# Altium PCB Stepper Board-v1.0.PcbDoc (part 7 of 8)
Units mil, origin at the board's own origin, x right, y up, seen from the top; angles counter-clockwise.
Board outline 6225.19 x 6531 mil, 4 copper layers (Top Layer, Layer-1, Layer-2, Bottom Layer), stack 61.654 mil thick; 410 components, 372 nets, 1464 pads, 1083 vias.
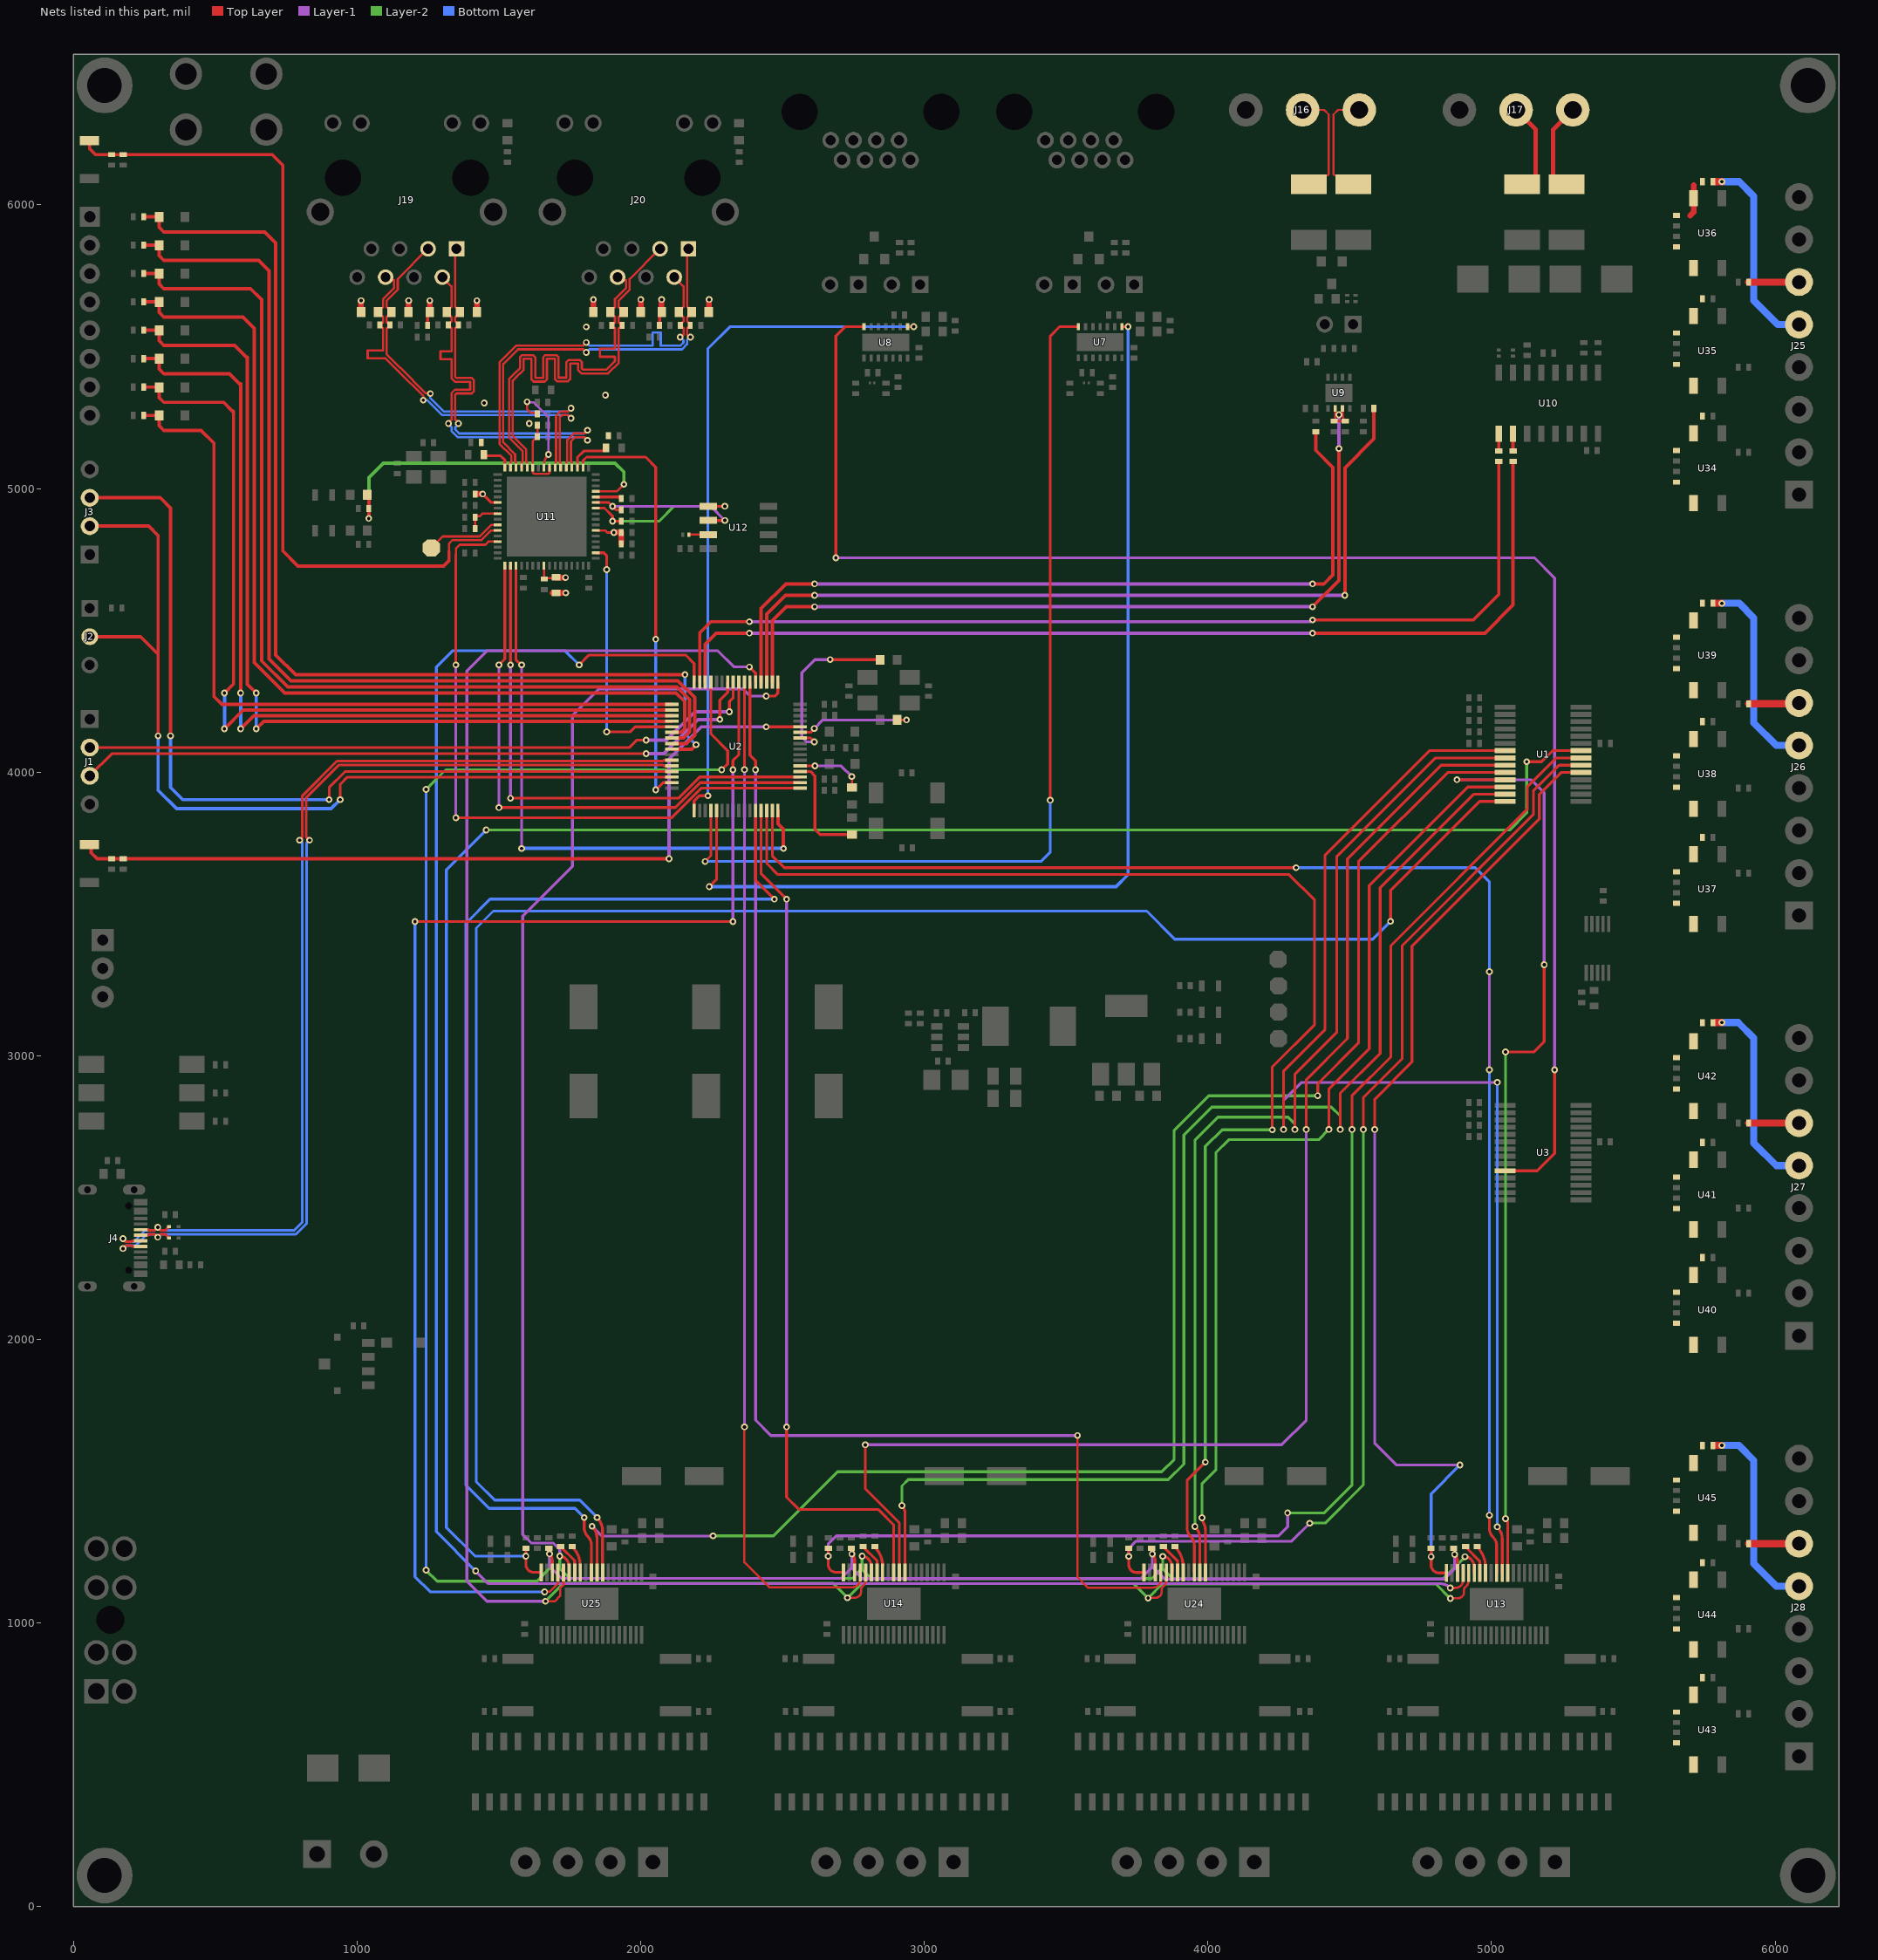
[diagram p6: the nets of this part, all layers, seen from the top]

## Via types
v1: diameter 23.62, hole 11.81, Top Layer to Bottom Layer, 1081 vias
v2: diameter 23.62, hole 11.81, Top Layer to Bottom Layer, tented both sides, 2 vias

## Nets (pads, with @x,y where several pads share a name; then routed paths per layer and width w, separated by ;. In a path a pad name is that pad's centre, name@x,y a point inside that pad or via, vN(x,y) a via of type N, cw(c..) or ccw(c..) an arc to the next point about the centre after c; other vN are vias at no path point) (continued)
NetR69_1: R69.1 U10.10 | length 60.8
  Top Layer w12: R69.1@5075.76,5132.86 U10.10@5075.76,5193.69
NetR70_1: R70.1 U10.9 | length 60.8
  Top Layer w12: R70.1@5025.76,5132.86 U10.9@5025.76,5193.69
NetR73_2: R73.2 R74.2 U11.8 | length 123.4
  Top Layer w8: R73.2@1416.05,4860.05 R74.2@1416.05,4899.12 1419.29,4902.37 1432.37,4902.37 1441.36,4911.36 U11.8@1495.32,4911.36
NetR75_2: R75.2 U11.57 | length 358.3
  Top Layer w8: v1(1599.01,5306) 1599.01,5279.99 1611.75,5267.25 R75.2@1638.16,5267.25 ; R75.2@1635.5,5263 1635.5,5267.25 R75.2@1635.5,5271.5 ; U11.57@1658.71,5074.75 1658.71,5082.23 cw(c1712.62,5082.23) v1(1674.5,5120.35)
  Layer-1 w8: v1(1599.01,5306) 1601.34,5303.68 1622.82,5303.68 1674.5,5252 v1(1674.5,5120.35)
NetR76_2: R76.2 U11.44 | length 89.7
  Top Layer w10: U11.44@1841.78,4970.42 R76.2@1931.5,4970.42
NetR82_1: R82.1 U12.7 | length 68.9
  Top Layer w8: R82.1@2169.38,4837.52 U12.7@2238.25,4837.52
NetR103_2: R103.2 U13.12 | length 76.7
  Top Layer w10: R103.2@4950.13,1267.02 cw(c4881.04,1197.94) U13.12@4978.75,1197.94
NetR104_2: R104.2 U13.13 | length 109.5
  Top Layer w10: R104.2@4909.6,1267.02 4958.54,1218.08 ; U13.13@4959.06,1176.5 4959.06,1216.83
NetR105_2: R105.2 U14.12 | length 76.7
  Top Layer w10: R105.2@2824.13,1269 cw(c2755.04,1199.91) U14.12@2852.75,1199.91
NetR106_2: R106.2 U14.13 | length 109.5
  Top Layer w10: R106.2@2783.6,1269 2832.54,1220.06 ; U14.13@2833.06,1178.47 2833.06,1218.81
NetR118_2: R118.2 U24.12 | length 76.7
  Top Layer w10: R118.2@3884.13,1268.35 cw(c3815.04,1199.26) U24.12@3912.75,1199.26
NetR119_2: R119.2 U24.13 | length 109.5
  Top Layer w10: R119.2@3843.6,1268.35 3892.54,1219.41 ; U24.13@3893.06,1177.82 3893.06,1218.16
NetR120_2: R120.2 U25.12 | length 98.2
  Top Layer w10: R120.2@1758.13,1269 cw(c1689.04,1199.91) 1786.75,1199.91 U25.12@1786.75,1178.47
NetR121_2: R121.2 U25.13 | length 110.9
  Top Layer w10: R121.2@1717.6,1269 1766.54,1220.06 cw(c1765.29,1218.81) 1767.06,1218.81 U25.13@1767.06,1178.47
NetR126_2: R126.2 U34.1
NetR127_2: R127.2 U35.1
NetR128_2: R128.2 U36.1
NetR129_2: R129.2 U37.1
NetR130_2: R130.2 U38.1
NetR131_2: R131.2 U39.1
NetR132_1: R132.1 R138.1 U34.4
NetR133_1: R133.1 R139.1 U35.4
NetR134_1: R134.1 R140.1 U36.4 | length 111.9
  Top Layer w20: 5700.67,5962.79 5712.39,5974.51 U36.4@5712.39,6023.32 5712.39,6069.79
NetR135_1: R135.1 R141.1 U37.4
NetR136_1: R136.1 R142.1 U38.4
NetR137_1: R137.1 R143.1 U39.4
NetR144_2: R144.2 U40.1
NetR145_2: R145.2 U41.1
NetR146_2: R146.2 U42.1
NetR147_2: R147.2 U43.1
NetR148_2: R148.2 U44.1
NetR149_2: R149.2 U45.1
NetR150_1: R150.1 R156.1 U40.4
NetR151_1: R151.1 R157.1 U41.4
NetR152_1: R152.1 R158.1 U42.4
NetR153_1: R153.1 R159.1 U43.4
NetR154_1: R154.1 R160.1 U44.4
NetR155_1: R155.1 R161.1 U45.4
NetTP5_1: TP5.1 U11.10 | length 267.3
  Top Layer w8: TP5.1@1261.57,4791 1301.72,4831.15 1432.43,4831.15 1473.27,4871.99 U11.10@1495.32,4871.99
nFAULT_CAN: U2.53 U7.8 | length 3727.9
  Top Layer w8: U7.8@3696.77,5570.81 v1(3718.5,5570.81)
  Top Layer w10: v1(2241.52,3596) 2267.1,3621.59 U2.53@2267.1,3864.63
  Bottom Layer w12: v1(2241.52,3596) 3676,3596 3718.5,3638.5 v1(3718.5,5570.81)
nFAULT_CAN_2: U2.49 U8.8 | length 2452.8
  Top Layer w8: U8.8@2940.69,5570.61 v1(2962.42,5570.61)
  Top Layer w10: U2.49@2188.36,3864.63 2188.36,3898.15 2207.21,3917 v1@2244,3917
  Bottom Layer w10: v1(2237,3917) 2237,5444.61 2237,5494 2313.61,5570.61 v1(2962.42,5570.61)
NRST: C11.2 R33.1 SW1.2 U2.12 | length 2936.4
  Top Layer w12: SW1.2@62.49,3743.95 62.49,3715.37 83.36,3694.5 C11.2@134,3694.5 R33.1@175,3694.5 2098.5,3694.5 v1@2100,3696 ; v1(2442.18,4159.9) U2.12@2562.37,4159.9
  Layer-1 w12: v1(2100,3694.5) 2100,4046 2213.9,4159.9 v1(2442.18,4159.9)
nSLEEP-1: U1.25 U13.8 | length 3365.1
  Top Layer w10: v1(4878,3973.29) U1.25@5047.97,3973.29 ; v1(5049.26,1367.86) cw(c5029.41,1348) 5057.49,1348 U13.8@5057.49,1176.5 ; v1(5049.26,3013.02) 5149.33,3013.02 5185.96,3049.64 v1(5185.96,3320.62)
  Layer-1 w10: v1(4878,3973.29) 5139.71,3973.29 5186,3927 5186,3320.66 v1(5185.96,3320.62)
  Layer-2 w10: v1(5049.26,1367.86) v1(5049.26,3013.02)
nSLEEP-2: U1.26 U24.8 | length 3480.7
  Top Layer w10: v1(3978.93,1370.86) 3978.44,1370.86 3975.15,1367.56 cw(c3925.2,1323.99) 3991.49,1323.97 ; U24.8@3991.49,1177.82 3991.49,1323.92 ; v1(4426.39,2740) 4426.39,2882.39 4569,3025 4569,3599.87 4916.84,3947.7 U1.26@5047.97,3947.7
  Layer-2 w10: v1(3978.93,1370.86) 3978.93,1490 4028,1539.07 4028,2658 4074,2704 4390.39,2704 v1(4426.39,2740)
nSLEEP-3: U1.27 U14.8 | length 4634.2
  Top Layer w10: v1(2921,1414) cw(c2895.69,1388.69) 2931.49,1388.69 U14.8@2931.49,1178.47 ; v1(4466.55,2740) 4466.55,2867.55 4607,3008 4607,3592.04 4937.07,3922.11 U1.27@5047.97,3922.11
  Layer-2 w10: v1(2921,1414) 2921,1483 2943,1505 3860,1505 3915,1560 3915,2720 4014,2819 4435,2819 4466.55,2787.45 v1(4466.55,2740)
nSLEEP-4: U1.28 U25.8 | length 6588.1
  Top Layer w10: v1(1846.07,1371.51) cw(c1799.2,1324.64) 1865.49,1324.62 ; U25.8@1865.49,1178.47 1865.49,1324.57 ; v1(4644,3474) 4644,3583 4957.52,3896.52 U1.28@5047.97,3896.52
  Bottom Layer w10: v1(1846.07,1371.51) 1784.58,1433 1485,1433 1420,1498 1420,3450 1480,3510 3784,3510 3883,3411 4581,3411 4643,3473 v1@4645,3473
nSTB_CAN: U2.52 U7.14 | length 3351.6
  Top Layer w10: v1(2227,3685) 2247.42,3705.42 U2.52@2247.42,3864.63 ; v1(3444,3901) 3444,5538 3476.81,5570.81 U7.14@3543.23,5570.81
  Bottom Layer w10: v1(2227,3685) 3411,3685 3444,3718 v1(3444,3901)
nSTB_CAN_2: U3.24 U8.14 | length 5687.9
  Top Layer w10: v1(2687.92,4756) 2687.92,5537.8 2720.73,5570.61 U8.14@2787.14,5570.61 ; U3.24@5047.97,2594.32 5161.55,2594.32 5222.58,2655.34 v1(5222.58,2950)
  Layer-1 w10: v1(2687.92,4756) 3542,4756 5151,4756 5222.58,4684.42 v1(5222.58,2950)
PA8: D6.1 R27.1 U2.36 | length 3223
  Top Layer w12: R27.1@247.5,5558 D6.1@301.71,5558 301.71,5521.29 318,5505 567.72,5505 609,5463.72 ; 613,5463.72 613,4310 v1(644,4279) ; v1(644,4153) 670.58,4179.58 U2.36@2109.63,4179.58
  Bottom Layer w12: v1@639,4153 v1@639.5,4153.5 ; v1(644,4153) v1(644,4279)
PB13: D3.1 R30.1 U2.33 | length 2829
  Top Layer w12: R30.1@247.5,5258 D3.1@301.72,5258 301.72,5221.29 318.01,5205 450,5205 495,5160 495,4267 523.36,4238.64 U2.33@2109.63,4238.64
PB14: D4.1 R29.1 U2.34 | length 3107
  Top Layer w12: R29.1@247.5,5358 D4.1@301.71,5358 ; D4.1@301.71,5357 301.71,5320.29 317.99,5304 529,5304 560,5273 ; v1(532,4153) 597.95,4218.95 U2.34@2109.63,4218.95 ; v1(532,4279) 564,4311 564,5273
  Bottom Layer w12: v1(532,4153) v1(532,4279)
PB15: D5.1 R28.1 U2.35 | length 3151.7
  Top Layer w12: R28.1@247.5,5458 D5.1@301.71,5458 301.71,5421.29 318,5405 549,5405 585,5369 ; v1(589,4153) 635.27,4199.27 U2.35@2109.63,4199.27 ; v1(589,4279) 589,5369
  Bottom Layer w12: v1(589,4153) v1(589,4279)
PC6: D7.1 R26.1 U2.38 | length 3349.3
  Top Layer w12: R26.1@247.5,5658 D7.1@301.71,5658 301.71,5621.29 318,5605 597,5605 637,5565 637,4387 745,4279 2124.96,4279 2155,4248.96 2155,4153 2142.31,4140.31 2109.72,4140.31 U2.38@2109.63,4140.21
PC7: D8.1 R25.1 U2.39 | length 3499.7
  Top Layer w12: R25.1@247.5,5758 D8.1@301.71,5758 301.71,5721.29 318,5705 624,5705 663,5666 663,4392 755,4300 2128,4300 2172,4256 2172,4142 2150.53,4120.53 U2.39@2109.63,4120.53
PC14-OSC32_IN: R2.2 U2.4 | length 384.2
  Top Layer w10: U2.4@2562.37,4002.42 2598.22,4002.42 2614,3986.64 2614,3798.7 2632.7,3780 R2.2@2744.37,3780
PC15-OSC32_OUT: R3.2 U2.5 | length 235.9
  Top Layer w8: R3.2@2744.37,3946 v1(2744.37,3984.37)
  Top Layer w10: U2.5@2562.47,4022 v1(2614,4022)
  Layer-1 w10: v1(2614,4022) 2706.74,4022 v1(2744.37,3984.37)
PD8: D9.1 R24.1 U2.40 | length 3652.1
  Top Layer w12: R24.1@247.5,5858 D9.1@301.71,5858 301.71,5821.29 318,5805 652,5805 689,5768 689,4399 766,4322 2131,4322 2190,4263 2190,4130 2160.84,4100.84 U2.40@2109.63,4100.84
PD9: D11.1 R23.1 U2.41 | length 3805.7
  Top Layer w12: R23.1@247.5,5958 D11.1@301.71,5958 301.71,5921.29 318,5905 674,5905 713,5866 713,4413 783,4343 v1@2156.51,4343 ; U2.41@2109.63,4081.16 2179.16,4081.16 v1(2195,4097)
  Bottom Layer w10: v1(2156,4344) 2156,4136 v1(2195,4097)
PF0-OSC_IN: R4.2 U2.10 | length 629.1
  Top Layer w10: U2.10@2562.37,4120.53 2598.22,4120.53 v1(2612,4106.75) ; v1(2668,4397) 2843.12,4397 R4.2@2844.12,4396
  Layer-1 w10: v1(2612,4106.75) 2585.26,4106.75 2568,4124 2568,4351 2614,4397 v1(2668,4397)
PF1-OSC_OUT: R5.2 U2.11 | length 425.6
  Top Layer w10: U2.11@2562.37,4140.21 2598.22,4140.21 v1(2612,4154) ; R5.2@2904.13,4183.96 v1(2937,4183.96)
  Layer-1 w10: v1(2612,4154) 2641.97,4183.96 v1(2937,4183.96)
PUL+_1: J25.6 NT19.2 | length 177.5
  Top Layer w25: NT19.2@5906.89,5728.29 J25.6@6084.39,5728.29
PUL+_2: J27.6 NT25.2 | length 177.5
  Top Layer w25: NT25.2@5906.89,2762.63 J27.6@6084.39,2762.63
PUL+_3: J26.6 NT22.2 | length 177.5
  Top Layer w25: NT22.2@5906.89,4241.29 J26.6@6084.39,4241.29
PUL+_4: J28.6 NT28.2 | length 177.5
  Top Layer w25: NT28.2@5906.89,1279.29 J28.6@6084.39,1279.29
PUL-_1: J25.5 R140.2 | length 718.8
  Top Layer w25: 5789.89,6082.29 v1(5812.39,6082.29)
  Bottom Layer w25: v1(5812.39,6082.29) 5873.71,6082.29 5925,6031 5925,5663 6009.71,5578.29 J25.5@6084.39,5578.29
PUL-_2: J27.5 R158.2 | length 720
  Top Layer w25: 5789.89,3116.96 v1(5812.39,3116.96)
  Bottom Layer w25: v1(5812.39,3116.96) 5870.04,3116.96 5925,3062 5925,2692.16 6004.53,2612.63 J27.5@6084.39,2612.63
PUL-_3: J26.5 R143.2 | length 719.2
  Top Layer w25: 5789.89,4595.29 v1(5812.39,4595.29)
  Bottom Layer w25: v1(5812.39,4595.29) 5873.71,4595.29 5925,4544 5925,4173.49 6004.53,4093.96 J26.5@6084.39,4093.96
PUL-_4: J28.5 R161.2 | length 713.4
  Top Layer w25: 5789.89,1625.63 v1(5812.39,1625.63)
  Bottom Layer w25: v1(5812.39,1625.63) 5872.38,1625.63 5925,1573 5925,1208.83 6004.53,1129.29 J28.5@6084.39,1129.29
RE/DE/RS485/T: R59.1 R60.1 U2.18 U9.2 U9.3 | length 2990.9
  Top Layer w8: U9.2@4448.95,5282.43 4448.95,5247.47 cw(c4435.21,5247.47) R60.1@4444.93,5237.75 R59.1@4484.25,5237.75 cw(c4507.65,5261.15) 4474.55,5261.15 U9.3@4474.55,5282.43
  Top Layer w12: U2.18@2463.95,4317.37 2463.95,4533.95 2513,4583 v1(2613,4583) ; v1(4369,4583) 4461.75,4675.75 v1(4461.75,5141.22)
  Layer-1 w12: v1@2612,4583 v1(4369,4583) ; v1(4461.75,5141.22) v1(4461.75,5260.15)
RESET-1: U1.21 U13.9 | length 4432.9
  Top Layer w10: v1(4266.97,2740) 4266.97,2946.97 4413,3093 4413,3708 4780.65,4075.65 U1.21@5047.97,4075.65 ; v1(5020.12,1338.95) cw(c4977.43,1296.27) 5037.8,1296.27 U13.9@5037.8,1176.5
  Layer-1 w10: v1(4266.97,2740) 4266.97,2842.97 4330,2906 v1(5020.12,2906)
  Bottom Layer w10: v1(5020.12,1338.95) 5020.12,2904.2 v1@5021.92,2906
RESET-2: U1.22 U24.9 | length 3705.4
  Top Layer w10: v1(3954.12,1340.28) cw(c3911.43,1297.59) 3971.8,1297.59 U24.9@3971.8,1177.82 ; v1(4306.94,2740) 4306.94,2934.94 4454,3082 4454,3702 4802.06,4050.06 U1.22@5047.97,4050.06
  Layer-2 w10: v1(3954.12,1340.28) 3954.12,2702.12 4035,2783 4283,2783 4306.94,2759.07 v1(4306.94,2740)
RESET-3: U1.23 U14.9 | length 4822.1
  Top Layer w10: v1(2792,1628) 2792,1472.33 2911.8,1352.54 U14.9@2911.8,1178.47 ; v1(4346.9,2740) 4346.9,2915.9 4492,3061 4492,3694 4822.47,4024.47 U1.23@5047.97,4024.47
  Layer-1 w10: v1(2792,1628) 4260,1628 4346.9,1714.9 v1(4346.9,2740)
RESET-4: U1.24 U25.9 | length 5595.2
  Top Layer w10: v1(1828.12,1340.93) cw(c1785.43,1298.24) 1845.8,1298.24 U25.9@1845.8,1178.47 ; v1(4387,2859) v1(4387,2859) 4387.06,2901.06 4531,3045 4531,3684 4845.88,3998.88 U1.24@5047.97,3998.88
  Layer-1 w10: v1(1828.12,1340.93) 1863.04,1306 v1@2255,1306
  Layer-2 w10: v1(2255,1307) 2468,1307 2694,1533 3837.38,1533 3881,1576.62 3881,2737 4003,2859 v1(4387,2859)
RS232_RX: F3.1 J17.1 | length 324.7
  Top Layer w12: F3.1@5225,6102.02 5254.04,6072.98 F3.1@5270.76,6072.98
  Top Layer w15: F3.1@5217.52,6097.02 5217.52,6102.02 5217.52,6266 J17.1@5286.76,6335.24
RS232_TX: F4.1 J17.2 | length 324.5
  Top Layer w12: F4.1@5110.45,6072.98 5126.96,6072.98 F4.1@5156,6102.02
  Top Layer w15: J17.2@5086.76,6335.24 5156,6266 F4.1@5156,6097.02
RS485_N: F1.2 J16.2 | length 394.2
  Top Layer w6.66: J16.2@4333.76,6335.24 4409.68,6335.24 4425.93,6319 4425.93,6108.59 4422.02,6104.69 4387.47,6104.69 F1.2@4355.76,6072.98
RS485_P: F2.2 J16.1 | length 393.2
  Top Layer w6.66: F2.2@4512.76,6072.98 4481.05,6104.69 4446.5,6104.69 4442.59,6108.59 4442.59,6319 4458.83,6335.24 J16.1@4533.76,6335.24
RST#: C40.2 R77.2 SW3.2 U11.11 | length 2978.9
  Top Layer w8: SW3.2@56.49,6226.95 59.86,6226.95 SW3.2@72,6214.8 ; 1324,4778.49 1324,4806 1336.15,4818.15 1438.54,4818.15 1472.69,4852.31 U11.11@1495.32,4852.31
  Top Layer w12: SW3.2@56.49,6226.95 56.49,6198.37 77.36,6177.5 C40.2@133,6177.5 ; C40.2@134,6177.5 R77.2@174,6177.5 ; R77.2@175,6177.5 700.07,6177.5 738,6139.57 738,4780 791,4727 1305,4727 1324,4746 1324,4778.49
RUNLED: R91.1 R92.2 U11.45 | length 1316.2
  Top Layer w8: U11.45@1841.78,4990.11 1915.89,4990.11 v1(1940.5,5014.71)
  Top Layer w12: R92.2@1035.55,4977.52 1041.05,4972.02 R91.1@1041.05,4929.52 v1(1041.05,4894.5)
  Layer-2 w12: v1(1041.05,4894.5) 1041.05,5039.05 1092,5090 1909,5090 1940.5,5058.5 v1(1940.5,5014.71)
RXA_N: C54.2 J19.6 R78.1 U11.54 | length 1442.7
  Top Layer w8: J19.6@1100.21,5745.51 1118.49,5745.51 1130,5734 1130,5706.91 1091.18,5668.1 1091.18,5639.59 R78.1@1074.31,5622.72 1091.18,5605.85 1091.18,5585.8 1086.06,5580.67 1083.81,5580.67 C54.2@1079.81,5576.67 1091.18,5565.31 1091.18,5519.09 1091.18,5487.09 1037.07,5487.09 1037.07,5459.09 1099.58,5459.09 1127.68,5430.98 1145.67,5413 1146.37,5413 1233.24,5326.13 v1(1233.24,5311.55) v1@1233.59,5311.19 ; U11.54@1717.76,5074.75 1716.84,5075.67 1716.84,5091.66 1714.42,5094.08 1714.42,5250.66 1722.76,5259 1743,5259 v1(1754,5248)
  Bottom Layer w8: v1(1233.24,5311.55) 1247.07,5311.55 1299.62,5259 1743,5259 v1(1754,5248)
RXA_P: C56.2 J19.3 R80.1 U11.55 | length 1451.4
  Top Layer w8: J19.3@1250.21,5845.51 1249.98,5845.51 1143,5738.53 1143,5701.53 1104.18,5662.71 1104.18,5639.59 R80.1@1121.05,5622.72 1104.18,5605.85 1104.18,5585.8 1109.3,5580.68 1111.55,5580.68 C56.2@1115.55,5576.68 1104.18,5565.31 1104.18,5472.87 1151.05,5426 1151.75,5426 1241.75,5336 1257,5336 v1(1258,5335) ; U11.55@1698.08,5074.75 1699,5075.67 1699,5091.66 1701.42,5094.08 1701.42,5256.05 1717.37,5272 1743,5272 v1(1754,5283)
  Bottom Layer w8: v1(1258,5335) 1258,5319 1305,5272 1743,5272 v1(1754,5283)
RXB_N: C55.2 J20.6 R79.1 U11.61 | length 1567.7
  Top Layer w8: U11.61@1579.97,5074.75 1579.97,5092.53 1583.31,5095.87 1583.31,5132.32 1535.68,5179.95 1535.68,5386.06 1561.56,5411.95 1568.62,5419 1569.37,5419 1574.06,5423.69 1574.06,5462.89 1581.67,5470.5 1620.44,5470.5 1628.06,5462.89 1628.06,5390.22 1656.06,5390.22 1656.06,5462.89 1663.67,5470.5 1702.44,5470.5 1710.06,5462.89 1710.06,5391 1738.05,5391 1738.05,5446.1 1745.67,5453.71 1784.44,5453.71 1792.05,5446.1 1792.05,5423.69 1796.74,5419 1834.29,5419 1879,5419 1909.17,5449.17 1909.17,5460.85 1909.17,5464.85 1855.54,5464.85 1855.54,5492.85 1909.17,5492.85 1909.17,5507.24 1909.17,5565.31 1897.8,5576.67 1901.8,5580.67 1904.04,5580.67 1909.17,5585.8 1909.17,5605.85 1892.3,5622.72 1909.17,5639.59 1909.17,5668.1 1947.98,5706.91 1947.98,5734 1936.47,5745.51 J20.6@1918.2,5745.51
  Top Layer w10: J20.6@1918.2,5734.04 J20.6@1918.2,5745.51
RXB_P: C57.2 J20.3 R81.1 U11.60 | length 1571.9
  Top Layer w8: U11.60@1599.65,5074.75 1599.65,5092.53 1596.31,5095.87 1596.31,5137.71 1548.68,5185.34 1548.68,5380.68 1561.56,5393.56 1574,5406 1574.75,5406 1587.06,5418.3 1587.06,5457.5 1615.06,5457.5 1615.06,5384.83 1622.67,5377.22 1661.44,5377.22 1669.06,5384.83 1669.06,5457.5 1697.06,5457.5 1697.06,5385.62 1704.67,5378 1743.44,5378 1751.05,5385.62 1751.05,5440.71 1779.05,5440.71 1779.05,5418.3 1791.36,5406 1834.29,5406 1884.39,5406 1922.17,5443.78 1922.17,5565.31 1933.53,5576.68 1929.53,5580.68 1927.29,5580.68 1922.17,5585.8 1922.17,5605.85 1939.03,5622.72 1922.17,5639.59 1922.17,5662.71 1960.98,5701.53 1960.98,5738.53 2067.97,5845.51 J20.3@2068.2,5845.51
  Top Layer w10: J20.3@2066.55,5845.51 J20.3@2067.97,5845.51
RXD/RS232: R70.2 U2.31 | length 3516.6
  Top Layer w12: U2.31@2208.05,4317.37 2208.05,4491.13 2247.42,4530.5 v1(2383,4530.5) ; v1(4369,4536.5) 4935.5,4536.5 5025.76,4626.76 R70.2@5025.76,5095.72
  Layer-1 w12: v1(2383,4530.5) 4359.86,4530.5 4365.86,4536.5 v1(4369,4536.5)
RXD/RS485: R57.1 U2.19 | length 3007.5
  Top Layer w12: U2.19@2444.27,4317.37 2444.27,4557.51 2510.26,4623.5 v1(2613,4623.5) ; v1(4483,4623.5) 4483,5073 4585.16,5175.16 R57.1@4585.16,5282.43
  Layer-1 w12: v1(2613,4623.5) v1(4483,4623.5)
SCL: R72.1 U11.43 U12.6 | length 575.4
  Top Layer w10: U11.43@1841.78,4950.74 1887.52,4950.74 v1(1900.75,4937.5) 1900.75,4937.15 1912.9,4925 R72.1@1931.5,4925 ; U12.6@2238.25,4887.52 v1(2296.57,4887.52)
  Layer-1 w10: v1(1900.75,4937.5) 2246.59,4937.5 v1(2296.57,4887.52)
SDA: R71.1 U11.42 U12.5 | length 594.9
  Top Layer w10: U11.42@1841.78,4931.05 1872.11,4931.05 1900.5,4902.66 1900.5,4885.25 v1(1900.75,4885) R71.1@1931.5,4885 ; U12.5@2238.25,4937.52 v1(2296.57,4937.52)
  Layer-2 w10: v1(1900.75,4885) 2065.5,4885 2118.02,4937.52 v1(2296.57,4937.52)
SPI2_MISO: R97.2 R98.2 R112.2 R113.2 U2.29 U13.17 U14.17 U24.17 U25.17 | length 8479.4
  Top Layer w10: v1(1678.07,1243.54) cw(c1653.34,1218.81) 1688.32,1218.81 U25.17@1688.32,1178.47 ; U2.29@2247.42,4317.37 2247.42,4134.96 2306.47,4075.91 2306.47,4029.42 v1(2285.38,4008.33) ; R98.2@2743.06,1263 2743.8,1262.27 2743.8,1243.82 v1(2744.53,1243.09) cw(c2719.34,1218.81) 2754.32,1218.81 U14.17@2754.32,1178.47 ; v1(3804.07,1242.89) cw(c3779.34,1218.16) 3814.32,1218.16 U24.17@3814.32,1177.82 ; R97.2@4867.49,1261.68 cw(c4861.26,1255.44) 4870.07,1255.44 v1(4870.07,1241.57) cw(c4845.34,1216.83) 4880.32,1216.83 U13.17@4880.32,1176.5
  Layer-1 w10: v1(1678.07,1243.54) 1678.07,1199.91 1721,1156.98 2707,1156.98 2744.07,1194.05 ; v1(2744.53,1243.09) 2744.07,1243.09 2744.07,1194.05 ; v1(3804.07,1242.89) 3804.07,1197.93 ; v1(4870.07,1241.57) 4870.07,1192.07 4833,1155 3847,1155 3804.07,1197.93 ; 2744.07,1194.05 2744.07,1193.26 2781,1156.33 3762.47,1156.33 3804.07,1197.93
  Layer-2 w10: v1(1243,1186) 1282,1147 1634,1147 1678.07,1191.07 v1(1678.07,1243.54) ; v1(1243,3939) 1312.33,4008.33 v1(2285.38,4008.33)
  Bottom Layer w10: v1(1243,1186) v1(1243,3939)
SPI2_MOSI: U2.21 U13.15 U14.15 U24.15 U25.15 | length 8445.9
  Top Layer w8: v1(1664,1076) 1681,1076 1697.1,1076 1716,1094.9 1716,1122.43 1727.69,1134.11 U25.15@1727.69,1178.47 ; v1(2729,1088.68) 2753.67,1088.68 ccw(c2753.67,1113.62) 2771.31,1095.98 ; 2771.32,1095.99 ccw(c2757.57,1109.73) 2777,1109.73 ; 2777,1109.05 2777,1117.78 cw(c2791.24,1117.78) 2781.17,1127.85 2785.34,1132.02 ccw(c2765.2,1152.16) 2793.69,1152.16 U14.15@2793.69,1178.47 ; v1@3789,1088.02 3813.67,1088.02 ccw(c3813.67,1112.97) 3831.31,1095.33 ; 3831.32,1095.34 ccw(c3817.57,1109.07) 3837,1109.07 3837,1117.12 cw(c3851.24,1117.12) 3841.17,1127.2 3845.34,1131.37 ccw(c3825.2,1151.51) U24.15@3853.69,1151.51 ; v1@4855,1086.7 4879.67,1086.7 ccw(c4879.67,1111.65) 4897.31,1094.01 ccw(c4883.57,1107.75) 4903,1107.75 4903,1115.8 cw(c4917.24,1115.8) 4907.17,1125.87 4911.34,1130.04 ccw(c4891.2,1150.18) U13.15@4919.69,1150.18
  Top Layer w10: v1(2383,4371) 2404.9,4349.1 U2.21@2404.9,4317.37
  Layer-1 w10: v1(1664,1076) 1457.84,1076 1386.84,1147 1386.84,4356.84 1458,4428 2271.98,4428 2328.98,4371 v1(2383,4371)
  Layer-2 w10: v1(1664,1076) 1726.98,1138.98 2678.7,1138.98 v1(2729,1088.68) 2778.65,1138.33 3738.02,1138.33 v1(3789,1087.35) 3838.65,1137 4804.02,1137 v1(4855,1086.02)
SPI2_NSS-1: U2.32 U13.16 | length 7837.8
  Top Layer w8: v1(4854.64,1123.19) 4872.31,1123.19 ccw(c4872.31,1150.89) U13.16@4900.01,1150.93 ; U13.16@4900.01,1150.89 U13.16@4900.01,1176.5
  Top Layer w10: v1(1783,4378) 1818,4413 2158.25,4413 2188.36,4382.89 U2.32@2188.36,4317.37
  Layer-1 w10: v1(1418,1183) 1462.67,1138.33 4818.09,1138.33 cw(c4818.09,1086.65) v1(4854.64,1123.19)
  Bottom Layer w10: v1(1418,1183) 1278.98,1322.02 1278.98,4370.98 1336,4428 1733,4428 v1(1783,4378)
SPI2_NSS-2: U2.22 U24.16 | length 4618.9
  Top Layer w8: v1(3540,1661) 3540,1161 3576.49,1124.51 3806.31,1124.51 ccw(c3806.31,1152.21) U24.16@3834.01,1152.26 ; U24.16@3834.01,1152.21 U24.16@3834.01,1177.82
  Top Layer w10: U2.22@2385.21,4317.37 2385.21,4059.42 2404.67,4039.96 v1(2404.67,4008.33)
  Layer-1 w10: v1(2404.67,4008.33) 2404.66,2098 2404.66,1715.34 2459,1661 3539,1661 v1@3540,1662
SPI2_NSS-3: U2.23 U14.16 | length 3566.2
  Top Layer w8: v1@2364,1691 2365.53,1689.47 2365.53,1213.47 2453.16,1125.84 2746.31,1125.84 ccw(c2746.31,1153.54) U14.16@2774.01,1153.59
  Top Layer w10: v1(2365.53,4008.7) U2.23@2365.53,4317.37
  Layer-1 w10: v1@2365.53,1690 v1(2365.53,1691) 2365.53,2101 v1(2365.53,4008.7)
SPI2_NSS-4: U2.24 U25.16 | length 4858.8
  Top Layer w8: v1(1661,1109.51) 1678.52,1109.51 1708.01,1139.01 U25.16@1708.01,1178.47
  Top Layer w10: v1(1204,3473) v1@2324.97,3473 ; v1@2325.14,4011.24 2325.14,4040.77 2345.84,4061.47 U2.24@2345.84,4317.37
  Layer-1 w10: v1@2325.14,3473 v1(2325.14,3473.18) v1(2325.14,4008.33)
  Bottom Layer w10: v1(1204,3473) 1204,1163 1257.49,1109.51 v1(1661,1109.51)
SPI2_SCK: U2.17 U13.14 U14.14 U24.14 U25.14 | length 7703.3
  Top Layer w10: v1(1714.59,1235.5) cw(c1714.65,1206.67) 1735.03,1227.06 cw(c1705.24,1197.26) U25.14@1747.38,1197.26 ; U25.14@1747.38,1178.47 U25.14@1747.38,1197.26 ; U25.14@1747.38,1202.12 U25.14@1747.38,1197.26 ; v1(2442.18,4268.32) 2473.95,4268.32 2483.64,4278.01 U2.17@2483.64,4317.37 ; v1(2780.59,1235.5) cw(c2780.65,1206.67) 2801.03,1227.06 cw(c2771.24,1197.26) U14.14@2813.38,1197.26 ; U14.14@2813.38,1179.15 U14.14@2813.38,1197.26 ; U14.14@2813.38,1202.8 U14.14@2813.38,1197.26 ; v1(3840.59,1234.85) cw(c3840.65,1206.02) 3861.03,1226.41 cw(c3831.24,1196.61) U24.14@3873.38,1196.61 ; U24.14@3873.38,1177.82 U24.14@3873.38,1196.61 ; U24.14@3873.38,1201.47 U24.14@3873.38,1196.61 ; v1(4906.59,1233.52) cw(c4906.65,1204.7) 4927.03,1225.08 cw(c4897.24,1195.29) U13.14@4939.38,1195.29 ; U13.14@4939.38,1176.5 U13.14@4939.38,1195.29 ; U13.14@4939.38,1200.15 U13.14@4939.38,1195.29
  Layer-1 w10: v1(1714.59,1235.5) 1714.59,1258.97 1692.06,1281.5 1614.14,1281.5 1584,1311.64 1584,3493 1759,3668 1759,4199.62 1853.14,4293.75 2359.78,4293.75 2385.21,4268.32 v1(2442.18,4268.32)
  Layer-2 w10: v1(1714.59,1235.5) 1714.59,1191.57 1749.18,1156.98 2745.66,1156.98 2780.59,1191.9 ; v1(2780.59,1235.5) 2780.59,1191.9 ; 3840.59,1194.64 3802.28,1156.33 2813.37,1156.33 2780.59,1189.11 2780.59,1191.9 ; v1(3840.59,1234.85) 3840.59,1190.92 3876.51,1155 4828.07,1155 v1(4906.59,1233.52)
SPI3_CS: U2.47 U11.50 | length 1505.3
  Top Layer w10: U11.50@1796.5,5074.75 1796.5,5098.5 1809,5111 2017,5111 2053,5075 v1(2053,4468.65) ; v1(2053,3937.46) 2078.6,3963.05 U2.47@2109.63,3963.05
  Bottom Layer w10: v1@2053,3937.23 v1(2053,3937.46) v1(2053,4468.65)
SPI3_MISO: U2.1 U11.13 | length 2364.3
  Top Layer w8: 1348,4768 1348,4788 1362,4802 1451.64,4802 1462.58,4812.94 U11.13@1495.32,4812.94
  Top Layer w10: v1(1348,3839) 2108,3839 2212.36,3943.36 U2.1@2562.37,3943.36 ; v1(1348,4378) 1348,4768
  Layer-1 w10: v1(1348,3839) v1(1348,4378)
SPI3_MOSI: U2.2 U11.17 | length 1958.8
  Top Layer w10: v1(1500,4378) 1520.91,4398.91 U11.17@1520.91,4728.29 ; v1@1501,3875 2121.62,3875 2209.67,3963.05 U2.2@2562.37,3963.05
  Layer-1 w10: v1@1500,3876 v1(1500,4378)
  other v1: 1500,3875
SPI3_SCK: U2.64 U11.19 | length 2069.3
  Top Layer w10: U11.19@1560.28,4728.29 1560.28,4395.72 1577,4379 v1@1577,4378
  Top Layer w12: U2.64@2483.64,3864.63 2483.64,3817.94 2503,3798.58 v1@2503,3730.9
  Layer-1 w10: v1@1580,3731 v1(1580,4378)
  Bottom Layer w12: v1(1580,3730.9) v1(2503.33,3730.9)
STEP-1: U2.63 U13.10 | length 5169.4
  Top Layer w10: U2.63@2463.95,3864.63 2463.95,3705.05 2506,3663 v1(4311,3663) ; v1@4992.52,1379 4992.52,1334.39 ccw(c5038.1,1334.39) 4998.92,1311.09 ccw(c5038.1,1334.39) 5005.87,1302.15 cw(c4976.31,1272.59) 5018.12,1272.59 U13.10@5018.12,1176.5
  Layer-1 w10: v1(4992.52,2950) v1(4992.52,3296)
  Bottom Layer w10: v1(4311,3663) 4943,3663 4992.52,3613.48 v1(4992.52,3296) ; v1(4992.52,1379.5) v1(4992.52,2950)
STEP-2: U2.62 U24.10 | length 4838.5
  Top Layer w10: U2.62@2444.27,3864.63 2444.27,3678.73 2484,3639 4286,3639 4376,3549 4376,3110 4227,2961 v1(4227,2739) ; U24.10@3952.12,1177.82 3952.12,1273.92 ccw(c3910.31,1273.92) 3939.87,1303.48 cw(c3972.1,1335.71) 3932.92,1312.42 cw(c3972.1,1335.71) 3926.52,1335.71 3926.52,1370.83 3926.52,1502.52 v1(3991,1567)
  Layer-2 w10: v1(3991,1567) 3991,2680 4050,2739 v1@4222,2739
  Bottom Layer w10: v1@4222,2739 v1@4225,2742
STEP-3: U2.61 U14.10 | length 3043.7
  Top Layer w10: U2.61@2424.58,3864.63 2424.58,3641.42 v1(2514,3552) ; v1(2514,1691) 2514,1443 2556.94,1400.07 2836.73,1400.07 2892.12,1344.68 U14.10@2892.12,1178.47
  Layer-1 w10: v1(2514,1691) v1(2514,3552)
STEP-4: U2.60 U25.10 | length 4107
  Top Layer w10: v1(1800.52,1371.48) 1800.52,1336.36 ccw(c1846.1,1336.36) 1806.92,1313.07 ccw(c1846.1,1336.36) 1813.87,1304.13 cw(c1784.31,1274.57) 1826.12,1274.57 U25.10@1826.12,1178.47 ; U2.60@2404.9,3864.63 2404.9,3618.1 v1(2471,3552)
  Bottom Layer w10: v1(1800.52,1371.48) 1768,1404 1466,1404 1384,1486 1384,3467 1469,3552 v1(2471,3552)
STL-1: R100.2 U1.5 U13.19 | length 3532.8
  Top Layer w10: v1(4588.36,2740) 4588.36,2846.36 4720,2978 4720,3386 5168.86,3834.86 5168.86,3921.86 5245.88,3998.88 U1.5@5315.68,3998.88 ; R100.2@4787,1261.02 v1(4787,1233.52) 4787,1204.54 ccw(c4816.02,1204.54) 4795.5,1184.02 ccw(c4813.67,1202.2) 4813.67,1176.5 U13.19@4840.95,1176.5
  Layer-1 w10: v1(4588.36,2740) 4588.36,1632.65 4664,1557 v1(4889,1557)
  Bottom Layer w10: v1(4787,1233.52) 4787,1455 v1(4889,1557)
STL-2: R115.2 U1.6 U24.19 | length 3975.7
  Top Layer w10: R115.2@3721,1262.35 v1(3721,1234.85) 3721,1205.87 ccw(c3750.02,1205.87) 3729.5,1185.35 ccw(c3747.67,1203.52) 3747.67,1177.82 U24.19@3774.95,1177.82 ; v1(4548.19,2740) 4548.19,2852.19 4685,2989 4685,3388 5147.57,3850.57 5147.57,3933.57 5238.47,4024.47 U1.6@5315.68,4024.47
  Layer-1 w10: v1(3721,1234.85) 3721,1263 3746,1288 4295.61,1288 v1(4358.98,1351.37)
  Layer-2 w10: v1@4358.98,1352.01 4414.01,1352.01 4548.19,1486.19 v1(4548.19,2740)
STL-3: R102.2 U1.7 U14.19 | length 5083.1
  Top Layer w10: R102.2@2661,1263 v1(2661,1235.5) 2661,1206.52 ccw(c2690.02,1206.52) 2669.5,1186 ccw(c2687.67,1204.17) 2687.67,1178.47 U14.19@2714.95,1178.47 ; v1(4508.03,2740) 4508.03,2858.03 ; 4508,2854 4508,2858 ; U1.7@5315.68,4050.06 5229.06,4050.06 5126.29,3947.29 5126.29,3869.29 4645,3388 4645,2995 4508.03,2858.03
  Layer-1 w10: v1(2661,1235.5) 2661,1278 2690,1307 4249,1307 4281.04,1339.04 v1@4281.04,1386
  Layer-2 w10: v1(4281.04,1388) 4411,1388 4508.03,1485.03 v1(4508.03,2740)
STL-4: R117.2 U1.8 U25.19 | length 7047.6
  Top Layer w10: R117.2@1595,1263 v1(1595,1235.5) 1595,1206.52 ccw(c1624.02,1206.52) 1603.5,1186 ccw(c1621.67,1204.17) 1621.67,1178.47 U25.19@1648.95,1178.47 ; v1(5124,4037) 5177,4037 5215.65,4075.65 U1.8@5315.68,4075.65
  Layer-2 w10: v1(1455,3796) 5064,3796 5124,3856 v1@5124,4036
  Bottom Layer w10: v1(1455,3796) 1315,3656 1315,1336.54 1416.04,1235.5 v1(1595,1235.5)
SW_CLK/BOOT0: J2.2 J3.2 U2.46 | length 3331.5
  Top Layer w9.23: v1(940,3903) 940,3957 965.73,3982.73 U2.46@2109.63,3982.73
  Top Layer w12: J2.2@57,4477.53 236.47,4477.53 295,4419 ; J3.2@57,4867.53 264.39,4867.53 298,4833.92 v1(298,4128)
  Bottom Layer w12: v1(298,4128) 298,3936 363,3871 908,3871 v1(940,3903)
SW_DIO: J3.3 U2.45 | length 3137
  Top Layer w9.23: v1(901,3903) 901,3945.85 957.57,4002.42 U2.45@2109.63,4002.42
  Top Layer w12: J3.3@57,4967.53 305.66,4967.53 342,4931.18 v1(342,4128)
  Bottom Layer w12: v1(342,4128) 342,3946 385,3903 v1(901,3903)
SYNC0: U2.37 U11.34 | length 901.2
  Top Layer w10: U11.34@1841.78,4773.57 1870.07,4773.57 1879.65,4763.99 v1(1879.65,4714.51) ; v1(1879.65,4142) 1962.17,4142 1980.07,4159.9 U2.37@2109.63,4159.9
  Bottom Layer w10: v1(1879.65,4142) v1(1879.65,4714.51)
SYNC1: U2.3 U11.18 | length 1872.6
  Top Layer w10: v1(1540.6,4378) U11.18@1540.6,4728.29 ; v1@1541,3908 2086,3908 2133.4,3908 2208.13,3982.73 U2.3@2562.37,3982.73
  Layer-1 w10: v1(1540.6,3908) v1(1540.6,4378)
TXA_N: C58.2 J19.2 R83.1 U11.52 | length 1440.7
  Top Layer w8: J19.2@1300.21,5745.51 1332.81,5712.91 1332.81,5640.9 1328.13,5636.22 1327.31,5636.22 1316.31,5625.22 R83.1@1316.31,5622.72 1316.31,5620.22 1327.31,5609.22 1328.13,5609.22 1332.81,5604.53 1332.81,5589.87 1328.13,5585.18 1326.81,5585.18 1321.81,5580.18 C58.2@1321.81,5576.68 1332.81,5565.68 1332.81,5516.32 1332.81,5484.32 1293.81,5484.32 1293.81,5456.32 1332.81,5456.32 1332.81,5402.15 1332.81,5388.96 1345.11,5376.66 1398.51,5376.66 1398.51,5348.66 1345.11,5348.66 1332.81,5336.36 1332.81,5274.41 1332.81,5243 1323.81,5234 1322,5234 v1(1322,5229.19) ; U11.52@1757.13,5074.75 1757.13,5092.53 1753.79,5095.87 1753.79,5165.85 1769.26,5181.31 1801.43,5181.31 1812,5170.74 v1(1812,5170)
  Bottom Layer w8: v1(1322,5229.19) 1322,5227.69 1333,5216.69 1333,5202.62 1354.39,5181.23 1799.5,5181.23 1810.73,5170 v1(1812,5170)
TXA_P: C60.2 J19.1 R85.1 U11.53 | length 1451.4
  Top Layer w8: J19.1@1350.21,5845.51 1345.81,5841.11 1345.81,5640.9 1350.5,5636.22 1351.31,5636.22 1362.31,5625.22 R85.1@1362.31,5622.72 1362.31,5620.22 1351.31,5609.22 1350.5,5609.22 1345.81,5604.53 1345.81,5589.87 1350.5,5585.18 1351.81,5585.18 1356.81,5580.18 C60.2@1356.81,5576.68 1345.81,5565.68 1345.81,5402.15 1345.81,5394.34 1350.5,5389.66 1403.9,5389.66 1411.51,5382.04 1411.51,5343.27 1403.9,5335.66 1350.5,5335.66 1345.81,5330.97 1345.81,5274.41 1345.81,5243 1354.81,5234 1357,5234 v1(1357,5229.19) ; U11.53@1737.45,5074.75 1737.45,5092.53 1740.79,5095.87 1740.79,5171.23 1763.87,5194.31 1801.43,5194.31 1812.08,5204.97 v1(1812.08,5205.46)
  Bottom Layer w8: v1(1357,5229.19) 1357,5227.69 1346,5216.69 1346,5208 1359.77,5194.23 1799.58,5194.23 1810.81,5205.46 v1(1812.08,5205.46)
TXB_N: C59.2 J20.2 R84.1 U11.63 | length 1448.4
  Top Layer w8: U11.63@1540.6,5074.75 1540.6,5092.53 1543.94,5095.87 1543.94,5115.33 1502,5157.27 1502,5444.39 1561.62,5504 1797,5504 v1(1808,5515) ; J20.2@2118.2,5745.51 2150.8,5712.91 2150.8,5640.9 2146.11,5636.22 2145.3,5636.22 2134.3,5625.22 2134.3,5620.22 2145.3,5609.22 2146.11,5609.22 2150.8,5604.53 2150.8,5589.87 2146.11,5585.18 2144.8,5585.18 2139.8,5580.18 2139.8,5576.68 2150.8,5565.68 2150.8,5541.96 2142.84,5534 v1(2139,5534)
  Bottom Layer w8: v1(1808,5515) 1819,5504 2038.55,5504 2042.55,5504 2042.55,5550.1 2070.55,5550.1 2070.55,5504 2107,5504 2140.49,5504 2150.5,5514.02 2150.5,5522.5 v1(2139,5534)
TXB_P: C61.2 J20.1 R86.1 U11.62 | length 1444
  Top Layer w8: U11.62@1560.28,5074.75 1560.28,5092.53 1556.94,5095.87 1556.94,5120.71 1515,5162.66 1515,5439 1567,5491 1797,5491 v1(1808,5480) ; J20.1@2168.2,5845.51 2163.8,5841.11 2163.8,5640.9 2168.48,5636.22 2169.3,5636.22 2180.3,5625.22 2180.3,5620.22 2169.3,5609.22 2168.48,5609.22 2163.8,5604.53 2163.8,5589.87 2168.48,5585.18 2169.8,5585.18 2174.8,5580.18 2174.8,5576.68 2163.8,5565.68 2163.8,5541.96 2171.75,5534 v1(2175,5534)
  Bottom Layer w8: v1(1808,5480) 1819,5491 2140.49,5491 2145.87,5491 2163.5,5508.63 2163.5,5522.5 v1(2175,5534)
TXD/RS232: R69.2 U2.30 | length 3546.3
  Top Layer w12: U2.30@2227.73,4317.37 2227.73,4451.73 2266,4490 v1(2383,4490) ; v1(4369,4490) 4977,4490 5076.26,4589.26 R69.2@5076.26,5095.73
  Layer-1 w12: v1(2383,4490) v1(4369,4490)
TXD/RS485: R56.1 U2.20 | length 2855.4
  Top Layer w12: U2.20@2424.58,4317.37 2424.58,4577.26 2511.32,4664 v1(2613,4664) ; v1(4369,4664) 4409,4664 4441.05,4696.05 4441.05,5073.95 4380.26,5134.74 R56.1@4380.26,5200.75
  Layer-1 w12: v1(2613,4664) v1(4369,4664)
USART1_RX: J1.3 U2.26 | length 2447.4
  Top Layer w10: J1.3@57,3987 135,4065 v1(2019.19,4065) ; v1(2278.79,4185.71) 2278.79,4253.91 2306.47,4281.59 U2.26@2306.47,4317.37
  Layer-1 w12: v1(2019.19,4065) 2081.65,4065 2202.14,4185.49 2278.79,4185.49 v1(2278.79,4185.71)
USART1_TX: J1.2 U2.25 | length 2417.6
  Top Layer w10: J1.2@57,4087 1960.32,4087 1986.32,4113 v1(2019.19,4113) ; v1(2312.38,4213.05) 2312.38,4248.96 2326.16,4262.74 U2.25@2326.16,4317.37
  Layer-1 w12: v1(2019.19,4113) 2091.08,4113 2191.12,4213.05 v1(2312.38,4213.05)
USB_N: D10.1 J4.A7 J4.B7 U2.43 | length 3726.1
  Top Layer w9.23: v1(174,2355) 174,2352.38 181.68,2344.7 205.04,2344.7 207.77,2347.43 J4.A7@236.01,2347.43 ; J4.B7@236.01,2386.8 264.24,2386.8 266.97,2384.07 286.07,2384.07 v1(297,2395) 297,2393.24 305.63,2384.61 324.45,2384.61 D10.1@336.84,2397 ; v1(797.19,3760) 806.71,3769.53 806.71,3916.83 928.94,4039.06 2078.66,4039.06 2081.39,4041.79 U2.43@2109.63,4041.79
  Bottom Layer w9.23: v1(174,2355) 184.39,2344.61 212.63,2344.61 252.63,2384.61 286.61,2384.61 v1(297,2395) 307.39,2384.61 777.94,2384.61 806.89,2413.56 806.89,3750.3 v1(797.19,3760)
USB_P: D12.1 J4.A6 J4.B6 U2.44 | length 3729.2
  Top Layer w9.23: v1(174,2320) 174,2322.8 181.68,2330.48 205.04,2330.48 207.77,2327.75 J4.B6@236.01,2327.75 ; J4.A6@236.01,2367.12 264.24,2367.12 266.97,2369.85 287.15,2369.85 v1(297,2360) 297,2361.76 305.63,2370.39 324.43,2370.39 D12.1@336.81,2358 ; v1(832,3760) 820.94,3771.06 820.94,3910.94 934.83,4024.83 2078.66,4024.83 2081.39,4022.1 U2.44@2109.63,4022.1
  Bottom Layer w9.23: v1@176.22,2320 v1(174,2320) 184.39,2330.39 218.52,2330.39 222.69,2334.55 258.52,2370.39 286.61,2370.39 v1(297,2360) 307.39,2370.39 783.83,2370.39 821.11,2407.67 821.11,3749.11 v1(832,3760)
VDD12TX1: C41.2 C42.2 FB5.2 U11.56 U11.59 | length 299.1
  Top Layer w8: C42.2@1630.5,5227.1 1635.5,5222.1 C41.2@1635.5,5183.35 ; C41.2@1633.67,5177 C41.2@1635.5,5177 ; C41.2@1635.5,5183 C41.2@1635.5,5183.35 ; U11.56@1678.39,5074.75 1678.39,5055.96 1673.71,5051.27 1624.03,5051.27 1619.34,5055.96 U11.59@1619.34,5074.75 1619.34,5167.19 C41.2@1635.5,5183.35
  Top Layer w20: FB5.2@1688.39,4631.96 FB5.2@1689.55,4631.96 ; FB5.2@1701.55,4631.96 v1(1735.69,4631.96)
  other v1: 1606.91,5229.19
VDD33TXRX1: C36.2 FB2.2 R78.2 R80.2 R83.2 R85.2 R87.2 U11.51 | length 351.4
  Top Layer w10: R87.2@1248.5,5575.55 1248.5,5614.9 R83.2@1256.31,5622.72 ; U11.51@1776.82,5074.75 1776.82,5110.31 1798.76,5132.25 1855.69,5132.25 ; 1860.69,5132.25 1864.63,5132.25 1871.44,5139.06 FB2.2@1871.44,5143
  Top Layer w20: R78.2@1013.81,5622.72 v1(1013.81,5662.72) ; R80.2@1181.56,5622.71 v1(1181.56,5662.72) ; R83.2@1256.31,5622.72 v1(1256.31,5662.72) ; R85.2@1422.31,5622.72 v1(1422.31,5662.72)
  other v1: 1875.5,5329.29
VDD33TXRX2: C37.2 FB3.2 R79.2 R81.2 R84.2 R86.2 R88.2 U11.64 | length 364
  Top Layer w8: R84.2@2066.19,5614.73 R84.2@2074,5622.55
  Top Layer w10: FB3.2@1453,5115.35 1506.07,5115.35 1520.91,5100.51 1520.91,5089.69 ; U11.64@1520.91,5074.75 1520.91,5089.69 ; 1520.91,5090.21 1520.91,5089.69 ; R88.2@2066.19,5575.55 R84.2@2066.19,5614.73 ; R88.2@2066.48,5575.55 2066.48,5614.9 R84.2@2074.3,5622.72
  Top Layer w20: R79.2@1833,5622.55 v1@1833,5662.55 ; R81.2@2000.25,5622.54 v1@2000.25,5662.54 ; R84.2@2073.49,5622.55 v1@2073.49,5662.55 ; R86.2@2241.2,5623.74 v1(2241.2,5666.72)
  other v1: 1448.1,5302 1808,5570 1833,5666.72 2000.25,5666.72 2073.49,5666.72
VDDCR: C44.2 C46.2 C48.2 C50.2 FB5.1 U11.6 U11.24 U11.38 | length 334.1
  Top Layer w8: U11.24@1658.71,4728.29 1658.71,4685.39 1660.05,4684.05 1686.52,4684.05 FB5.1@1689.55,4687.08 ; U11.38@1841.78,4852.31 1874.73,4852.31 1882.04,4845 v1(1905.38,4845)
  Top Layer w10: v1(1442.7,4980.72) 1472.69,4950.74 U11.6@1495.32,4950.74
  Top Layer w20: C48.2@1417.25,4980.72 v1(1442.7,4980.72) ; FB5.1@1699.45,4686.15 v1(1734.75,4686.15) ; v1(1905.38,4845) C50.2@1931.5,4845 C46.2@1931.5,4805
pads on no net: J4.A8 J4.B8 J4.MH J8. J13. J13.1 J13.2 J13.3 J13.6 J14. J14.1 J14.2 J14.3 J14.6 J19.7 J19.11 J19.12 J19.MH1 J19.MH2 J20.7 J20.11 J20.12 J20.MH1 J20.MH2 U1.11 U1.14 U1.20 U3.11 U3.14 U3.19 U3.20 U10.11 U10.12 U10.13 U10.14 U11.3 U11.12 U11.15 U11.16 U11.21 U11.22 U11.23 U11.25 U11.26 U11.27 U11.28 U11.29 U11.30 U11.31 U11.33 U11.35 U11.36 U11.39 U11.40 U11.49
copper on no net:
  other v2: 283.5,2186.28

## Polygon pours and split planes (outlines as drawn)
+24V on Top Layer "NONET_L-01_P-001" (solid, remove dead copper, pour order 42): 4911.39,2413 5532,2413 5532,1931 5559,1909 6062,1909 6062,1655 5315.16,1655 5316,1654.16 5316,1386 4995,1386 4995,1655 4224.42,1655 4224.42,1386 3887,1386 3887,1655 3180.24,1655 3180.24,1386 2836.73,1386 2836.73,1655 2111,1655 2111,1388.69 1016.82,1388.69 1016.82,1951.78 1162,1951.78 1162,3035 2967.14,3035 3053.08,2949.06 3053.08,2767.92 3137,2684 4907.33,2684 4911.39,2679.95
AOUT2-1 on Top Layer "NONET_L-01_P-001" (solid, remove dead copper, pour order 37): 5057,503.64 5057,451.98 5108.67,451.98 5108.67,278.86 5000,278.86 5000,81.34 5149,81.34 5149,214.12 5225,290.12 5225,535.94 5115,535.94 5115,681.33 5043.04,753.29 5043.04,989.5 5020.89,989.5 5020.89,670.75 5020.89,623.79 5057,623.79
BOUT2-1 on Top Layer "NONET_L-01_P-001" (solid, remove dead copper, pour order 32): 4628.69,543.98 4628.69,621.98 4672.31,621.98 4672.31,543.98 4789.23,543.98 4789.23,257.75 4832.23,214.75 4832.23,86.98 4680.23,86.98 4680.23,441.98 4680.71,442.45 4680.71,449.98 4498,449.98 4498,926.5 4846.85,926.5 4846.85,989.5 4866.54,989.5 4866.54,893.21 4598,893.21 4598,543.98
BOUT1-2 on Top Layer "NONET_L-01_P-001" (solid, remove dead copper, pour order 21): 3946.21,552.97 3946.21,451.98 3844.19,451.98 3844.19,279.5 3929,279.5 3929,81.34 3785.67,81.34 3785.67,233.34 3733,286.01 3733,539.75 3875.67,539.75 3875.67,708.01 3929,761.33 3929,989.5 3946.21,989.5
GND on Top Layer "NONET_L-01_P-001" (solid, remove dead copper, pour order 110): 974,998 974,9 1305,9 1305,808.18 5888.39,808.18 5888.39,6522 11,6522 11,998
BOUT1-3 on Top Layer "NONET_L-01_P-001" (solid, remove dead copper, pour order 11): 2888.33,555.42 2888.33,451.98 2783.86,451.98 2783.86,280 2868.67,280 2868.67,81.34 2725.33,81.34 2725.33,233.34 2672.67,286.01 2672.67,539.75 2815.34,539.75 2815.34,708.01 2868.67,761.33 2868.67,989.5 2888.33,989.5
AOUT1-1 on Top Layer "NONET_L-01_P-001" (solid, remove dead copper, pour order 36): 5182,989.5 5182,926.5 5556,926.5 5556,446.65 5333.52,446.65 5333.52,442.45 5334,441.98 5334,83 5159.85,83 5159.85,208.83 5225,273.98 5225,535.94 5381.5,535.94 5381.5,649.98 5427.5,649.98 5444,666.48 5444,893.21 5158.69,893.21 5158.69,989.5
BOUT1-1 on Top Layer "NONET_L-01_P-001" (solid, remove dead copper, pour order 33): 5014.33,560.75 5014.33,451.98 4904.52,451.98 4904.52,278.8 4989.33,278.8 4989.33,81.34 4846,81.34 4846,233.34 4793.33,286.01 4793.33,539.75 4936.01,539.75 4936.01,708.01 4989.33,761.33 4989.33,989.5 5014.33,989.5
AOUT2-2 on Top Layer "NONET_L-01_P-001" (solid, remove dead copper, pour order 29): 3996.67,503.64 3996.67,451.98 4048.33,451.98 4051.25,278.86 3939.67,278.86 3939.67,81.34 4088.67,81.34 4088.67,214.12 4164.67,290.12 4164.67,535.94 4054.67,535.94 4054.67,681.33 3982.71,753.29 3982.71,989.5 3952.11,989.5 3952.11,623.79 3996.67,623.79
AOUT1-2 on Top Layer "NONET_L-01_P-001" (solid, remove dead copper, pour order 25): 4121.67,989.5 4121.67,926.5 4495.67,926.5 4495.67,446.65 4273.19,446.65 4273.19,442.45 4273.67,441.98 4273.67,80 4099.52,80 4099.52,208.83 4164.67,273.98 4164.67,535.94 4321.17,535.94 4321.17,649.98 4367.17,649.98 4383.67,666.48 4383.67,893.21 4098.36,893.21 4098.36,989.5
BOUT2-2 on Top Layer "NONET_L-01_P-001" (solid, remove dead copper, pour order 38): 3568.36,543.98 3568.36,621.98 3611.97,621.98 3611.97,543.98 3728.9,543.98 3728.9,257.75 3771.9,214.75 3771.9,86.98 3619.9,86.98 3619.9,441.98 3620.38,442.45 3620.38,449.98 3437.67,449.98 3437.67,926.5 3780.85,926.5 3780.85,989.5 3814.33,989.5 3814.33,893.21 3537.67,893.21 3537.67,543.98
AOUT2-3 on Top Layer "NONET_L-01_P-001" (solid, remove dead copper, pour order 17): 2936.33,503.64 2936.33,451.98 2988,451.98 2990.92,278.86 2879.33,278.86 2879.33,81.34 3028.33,81.34 3028.33,214.12 3104.33,290.12 3104.33,535.94 2994.33,535.94 2994.33,681.33 2922.38,753.29 2922.38,989.5 2900.22,989.5 2900.22,670.75 2900.22,623.79 2936.33,623.79
AOUT1-3 on Top Layer "NONET_L-01_P-001" (solid, remove dead copper, pour order 12): 3061.33,989.5 3061.33,926.5 3435.33,926.5 3435.33,446.65 3212.86,446.65 3212.86,442.45 3213.33,441.98 3213.33,80 3039.18,80 3039.18,208.83 3104.33,273.98 3104.33,535.94 3260.83,535.94 3260.83,649.98 3306.83,649.98 3323.33,666.48 3323.33,893.21 3038.02,893.21 3038.02,989.5
BOUT2-3 on Top Layer "NONET_L-01_P-001" (solid, remove dead copper, pour order 10): 2508.02,543.98 2508.02,621.98 2551.64,621.98 2551.64,543.98 2668.56,543.98 2668.56,257.75 2711.57,214.75 2711.57,86.98 2559.56,86.98 2559.56,441.98 2560.04,442.45 2560.04,449.98 2377.33,449.98 2377.33,926.5 2728.73,926.5 2728.73,989.5 2740.54,989.5 2740.54,893.21 2477.33,893.21 2477.33,543.98
AOUT2-4 on Top Layer "NONET_L-01_P-001" (solid, remove dead copper, pour order 9): 1876,503.64 1876,451.98 1927.67,451.98 1927.67,278.86 1819,278.86 1819,81.34 1968,81.34 1968,214.12 2044,290.12 2044,535.94 1934,535.94 1934,681.33 1862.04,753.29 1862.04,989.5 1826.11,989.5 1826.11,623.79 1876,623.79
AOUT1-4 on Top Layer "NONET_L-01_P-001" (solid, remove dead copper, pour order 8): 2001,989.5 2001,926.5 2375,926.5 2375,446.65 2152.52,446.65 2152.52,442.45 2153,441.98 2153,80 1978.85,80 1978.85,208.83 2044,273.98 2044,535.94 2200.5,535.94 2200.5,649.98 2246.5,649.98 2263,666.48 2263,893.21 1977.69,893.21 1977.69,989.5
BOUT1-4 on Top Layer "NONET_L-01_P-001" (solid, remove dead copper, pour order 7): 1820.21,547.63 1820.21,451.98 1723.52,451.98 1723.52,279.5 1808.33,279.5 1808.33,81.34 1665,81.34 1665,233.34 1612.33,286.01 1612.33,539.75 1755.01,539.75 1755.01,708.01 1790.18,743.18 1790.18,989.5 1820.21,989.5
BOUT2-4 on Top Layer "NONET_L-01_P-001" (solid, remove dead copper, pour order 6): 1447.69,543.98 1447.69,621.98 1491.31,621.98 1491.31,543.98 1608.23,543.98 1608.23,257.75 1651.23,214.75 1651.23,86.98 1499.23,86.98 1499.23,441.98 1499.71,442.45 1499.71,449.98 1317,449.98 1317,926.5 1651.23,926.5 1651.23,989.5 1674.54,989.5 1674.54,893.21 1417,893.21 1417,543.98
VDD12TX1 on Top Layer "NONET_L-01_P-001" (solid, remove dead copper, pour order 109): 1588.79,5245.19 1644.5,5245.19 1644.5,5166.31 1605.13,5166.31 1588.79,5182.65
GND_A-1 on Top Layer "NONET_L-01_P-001" (solid, remove dead copper, pour order 93): 5331.31,650 5341.31,660 5406,660 5406,715 5209.38,715 5179,684.63 5179,550.79 5213.98,550.79 5213.98,651 5292.69,651 5292.69,550.79 5331.31,550.79
GND_B-4 on Top Layer "NONET_L-01_P-001" (solid, remove dead copper, pour order 108): 1473.52,660 1473.52,715 1670.96,715 1701.33,684.63 1701.33,550.79 1666.36,550.79 1666.36,651 1587.64,651 1587.64,550.79 1549.02,550.79 1549.02,650 1539.02,660
GND_B-3 on Top Layer "NONET_L-01_P-001" (solid, remove dead copper, pour order 107): 2538.19,660 2538.19,715 2735.62,715 2766,684.63 2766,550.79 2731.02,550.79 2731.02,651 2652.31,651 2652.31,550.79 2613.69,550.79 2613.69,650 2603.69,660
GND_B-2 on Top Layer "NONET_L-01_P-001" (solid, remove dead copper, pour order 102): 3597.19,660 3597.19,715 3794.62,715 3825,684.63 3825,550.79 3790.02,550.79 3790.02,651 3711.31,651 3711.31,550.79 3672.69,550.79 3672.69,650 3662.69,660
GND_B-1 on Top Layer "NONET_L-01_P-001" (solid, remove dead copper, pour order 101): 4665.19,660 4665.19,715 4862.62,715 4893,684.63 4893,550.79 4858.02,550.79 4858.02,651 4779.31,651 4779.31,550.79 4740.69,550.79 4740.69,650 4730.69,660
GND_A-4 on Top Layer "NONET_L-01_P-001" (solid, remove dead copper, pour order 100): 2142.31,650 2152.31,660 2217,660 2217,715 2020.38,715 1990,684.63 1990,550.79 2024.98,550.79 2024.98,651 2103.69,651 2103.69,550.79 2142.31,550.79
GND_A-3 on Top Layer "NONET_L-01_P-001" (solid, remove dead copper, pour order 99): 3204.31,650 3214.31,660 3279,660 3279,715 3082.38,715 3052,684.63 3052,550.79 3086.98,550.79 3086.98,651 3165.69,651 3165.69,550.79 3204.31,550.79
GND_A-2 on Top Layer "NONET_L-01_P-001" (solid, remove dead copper, pour order 94): 4263.31,650 4273.31,660 4338,660 4338,715 4141.38,715 4111,684.63 4111,550.79 4145.98,550.79 4145.98,651 4224.69,651 4224.69,550.79 4263.31,550.79
+5V on Top Layer "NONET_L-01_P-001" (solid, remove dead copper, pour order 51): 3582.03,3004 3651.01,3004 3651.01,2788 3303.03,2788 3303.03,2963.06 3427.97,2963.06 3427.97,3181.83 3582.03,3181.83
+24V on Top Layer "NONET_L-01_P-001" (solid, pour order 91): 5276.1,1587 5276.1,1437 5226.23,1387.13 5226.23,1233.81 5153.15,1233.81 5153.15,1158.97 5129.66,1158.97 5129.66,1351.96 5106.09,1375.53 5106.1,1587 5114.1,1587 5113.1,1588 5114.1,1587
+24V on Top Layer "NONET_L-01_P-001" (solid, pour order 92): 4211,1574.35 4211,1424.35 4161.13,1374.48 4161.13,1221.16 4088.05,1221.16 4088.05,1146.33 4064.57,1146.33 4064.57,1339.32 4041,1362.88 4041,1574.35 4049,1574.35 4048,1575.35 4049,1574.35
+24V on Top Layer "NONET_L-01_P-001" (solid, pour order 85): 3151,1575 3151,1425 3101.13,1375.13 3101.13,1221.81 3028.05,1221.81 3028.05,1146.98 3004.57,1146.98 3004.57,1339.97 2981,1363.54 2981,1575 2989,1575 2988,1576 2989,1575
GND on Top Layer "NONET_L-01_P-001" (solid, remove dead copper, pour order 43): 3194.09,3015.87 3194.09,2962 3265.02,2962 3265.02,2788 3066.02,2788 3066.02,3180.7 3110.29,3180.7 3110.29,3048.72 3118.39,3040.63 3157.57,3040.63
+3V3 on Top Layer "NONET_L-01_P-001" (solid, remove dead copper, pour order 82): 3891.49,2987.92 3891.49,2787.02 3773.06,2787.02 3773.06,2987.92 3820.25,2987.92
+24V on Top Layer "NONET_L-01_P-001" (solid, pour order 84): 2085,1575 2085,1425 2035.13,1375.13 2035.13,1221.81 1962.05,1221.81 1962.05,1146.98 1938.57,1146.98 1938.57,1339.97 1915,1363.54 1915,1575 1923,1575 1922,1576 1923,1575
+24V on Top Layer "NONET_L-01_P-001" (solid, remove dead copper, pour order 83): 5931,441.25 5346.49,441.25 5346.49,76 1528,76 1482.51,121.49 1482.51,444 1321,444 1321,8 6214,8 6214,6112 5931,6112
NetFB1_1 on Top Layer "NONET_L-01_P-001" (solid, remove dead copper, pour order 81): 295.32,2479.69 115,2479.69 115,2234.21 329.25,2234.21 329.25,2284.47 202.51,2284.47 202.51,2435.28 295.32,2435.28
NetC18_1 on Top Layer "NONET_L-01_P-001" (solid, remove dead copper, pour order 44): 2915,3132.01 3011.03,3132.01 3011.03,3101.01 3020.44,3091.6 3064,3091.6 3064,3180.7 2924.33,3180.7 2915,3171.37
+5V on Top Layer "NONET_L-01_P-001" (solid, remove dead copper, pour order 45): 3011.03,3069.79 2916.03,3069.79 2916.03,3123.51 3011.03,3123.51
+24V on Top Layer "NONET_L-01_P-001" (solid, remove dead copper, pour order 46): 3064.53,3059.01 3064.53,2797.01 2915,2797.01 2915,3067.8 2999,3067.8 3009,3079 3064.53,3079
NetC17_2 on Top Layer "NONET_L-01_P-001" (solid, remove dead copper, pour order 48): 3161.03,3180.7 3161.03,3092.22 3114.34,3092.22 3114.34,3180.7
NetC17_1 on Top Layer "NONET_L-01_P-001" (solid, remove dead copper, pour order 50): 3130.45,3085.82 3110.29,3085.82 3110.29,2967 3310.03,2967 3310.03,3181.01 3170.53,3181.01 3170.53,3085.82 3142.31,3085.82
NetD14_2 on Top Layer "NETD14_2_L01_P080" (solid, remove dead copper, pour order 80): 11,947 11,9 949,9 949,946 316,946 316,947
"CHASIS GND" on Layer-1 "NONET_L-01_P-001" (solid, remove dead copper, pour order 18): 807.08,6098 807.08,5684 2361,5684 2361,6098 5860.54,6098 5860.54,9 6210,9 6210,6514 11,6514 11,9 390,9 390,6098
+3V3 on Layer-1 "NONET_L-01_P-001" (solid, remove dead copper, pour order 26): 5256.76,5921.95 2420,5926.94 2420,5641 765,5641 765,6059 436,6059 436,617.71 5780,617.71 5780,5926.38
AOUT2-1 on Layer-1 "NONET_L-01_P-001" (solid, remove dead copper, pour order 106): 5020.89,451.98 5097,451.98 5097,278.86 5000,278.86 5000,81.34 5149,81.34 5149,214.12 5235,300.12 5235,552 5115,552 5020.89,552
AOUT1-1 on Layer-1 "NONET_L-01_P-001" (solid, remove dead copper, pour order 105): 5511,552 5511,85 5159.85,85 5159.85,200.85 5248,289 5248,552